# Altium PCB IMU Product.PcbDoc (part 1 of 2)
Units mil, origin at the board's own origin, x right, y up, seen from the top; angles counter-clockwise.
Board outline 944.97 x 945.36 mil, 4 copper layers (Top Layer, Layer 1, Layer 2, Bottom Layer), stack 62.63 mil thick; 58 components, 40 nets, 205 pads, 53 vias.
Unrouted connection lines stored in the file: 29.
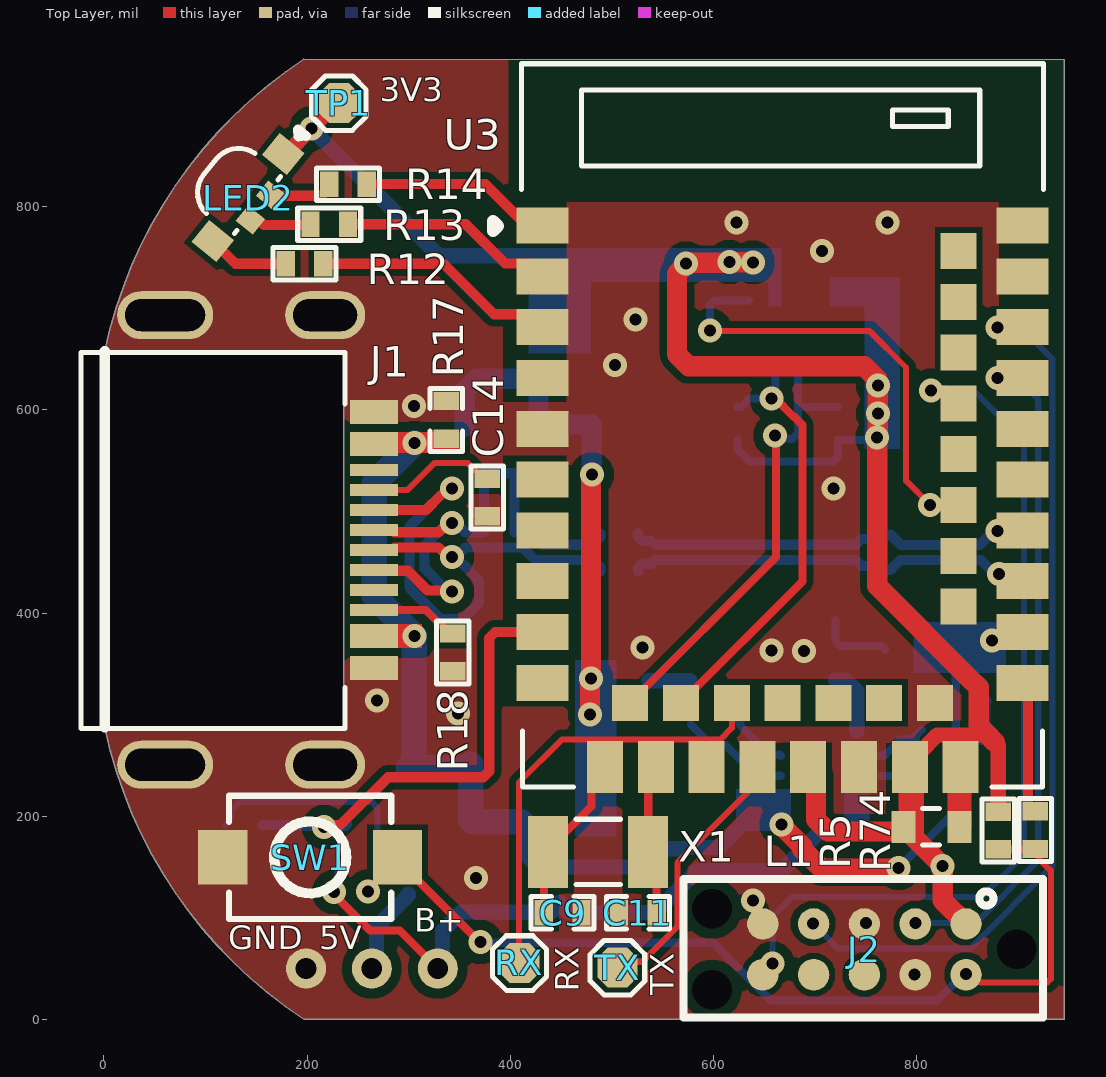
[diagram p0: Top Layer view]
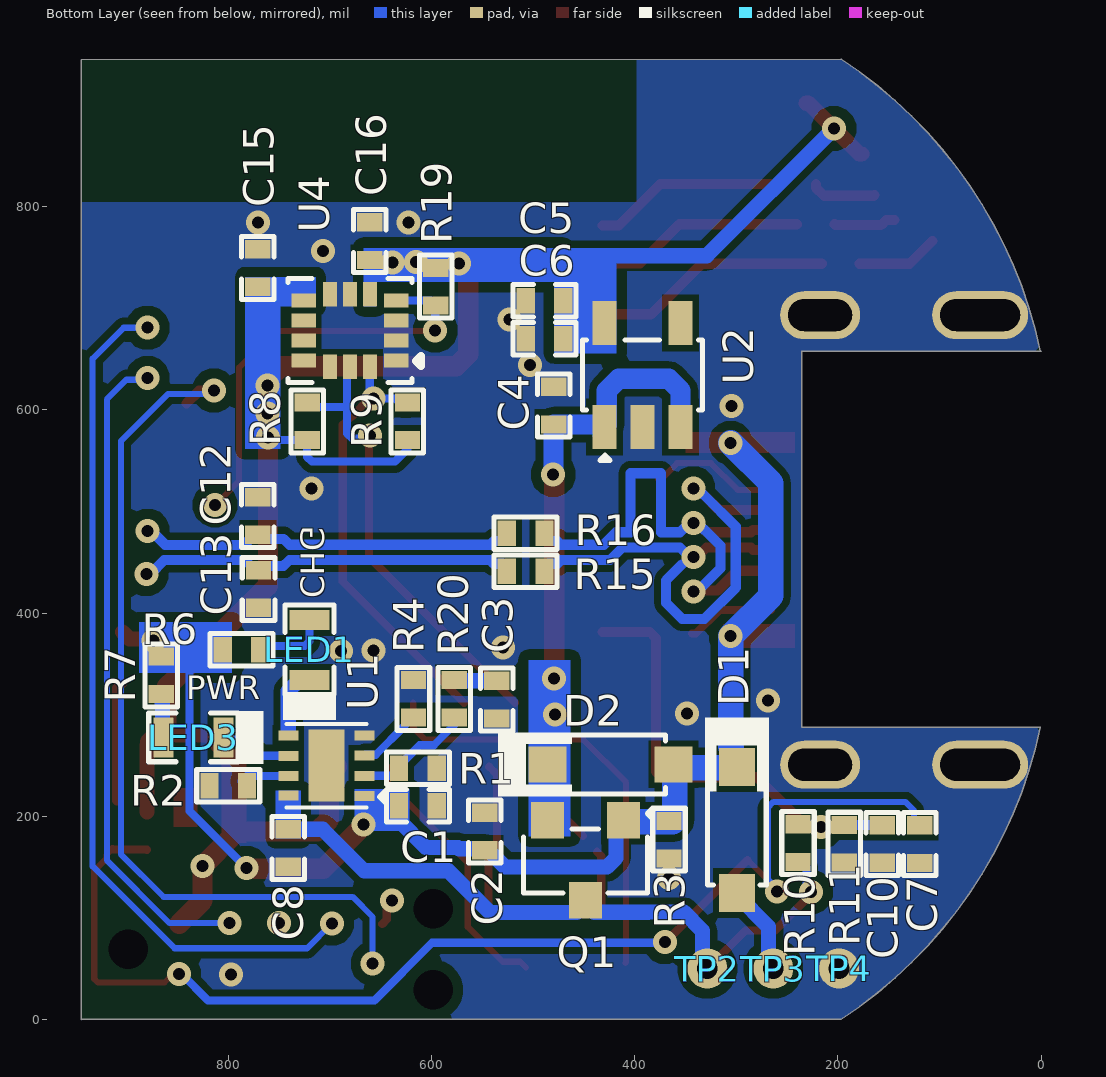
[diagram p1: Bottom Layer view, seen from below]
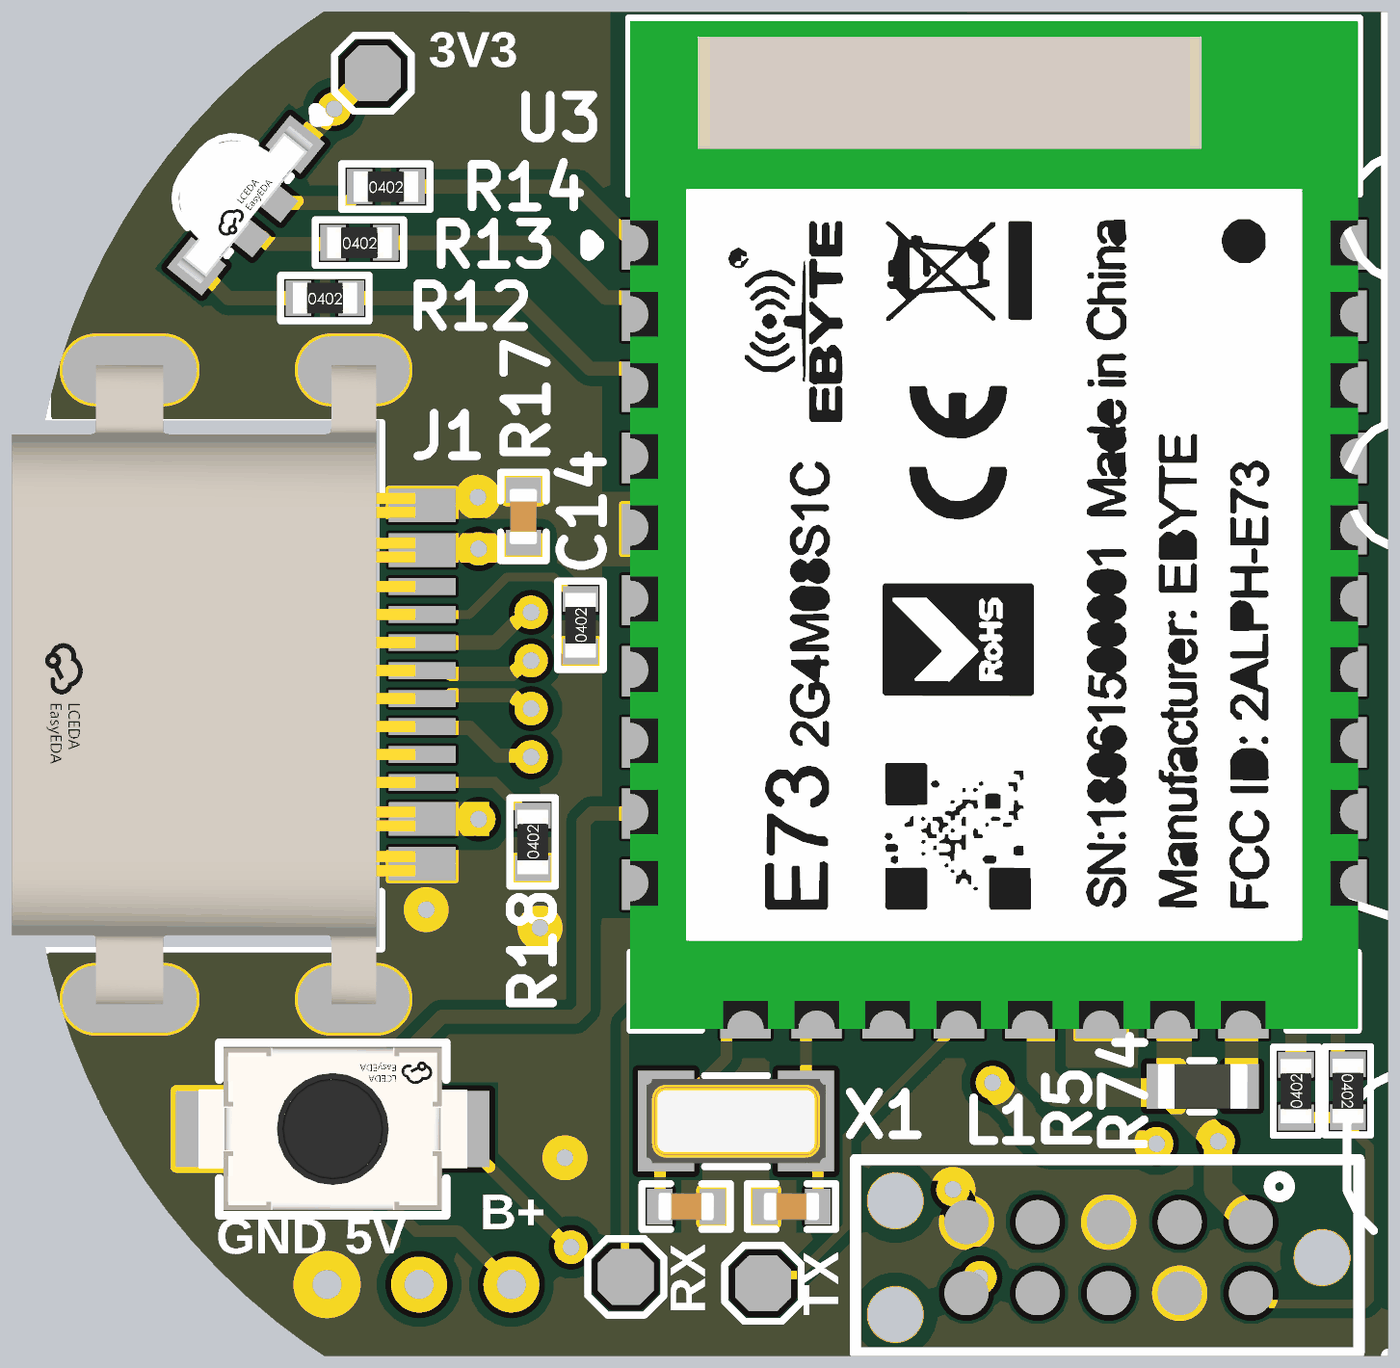
[diagram p2: 3D render of the assembled board from above, using the file's embedded part models]
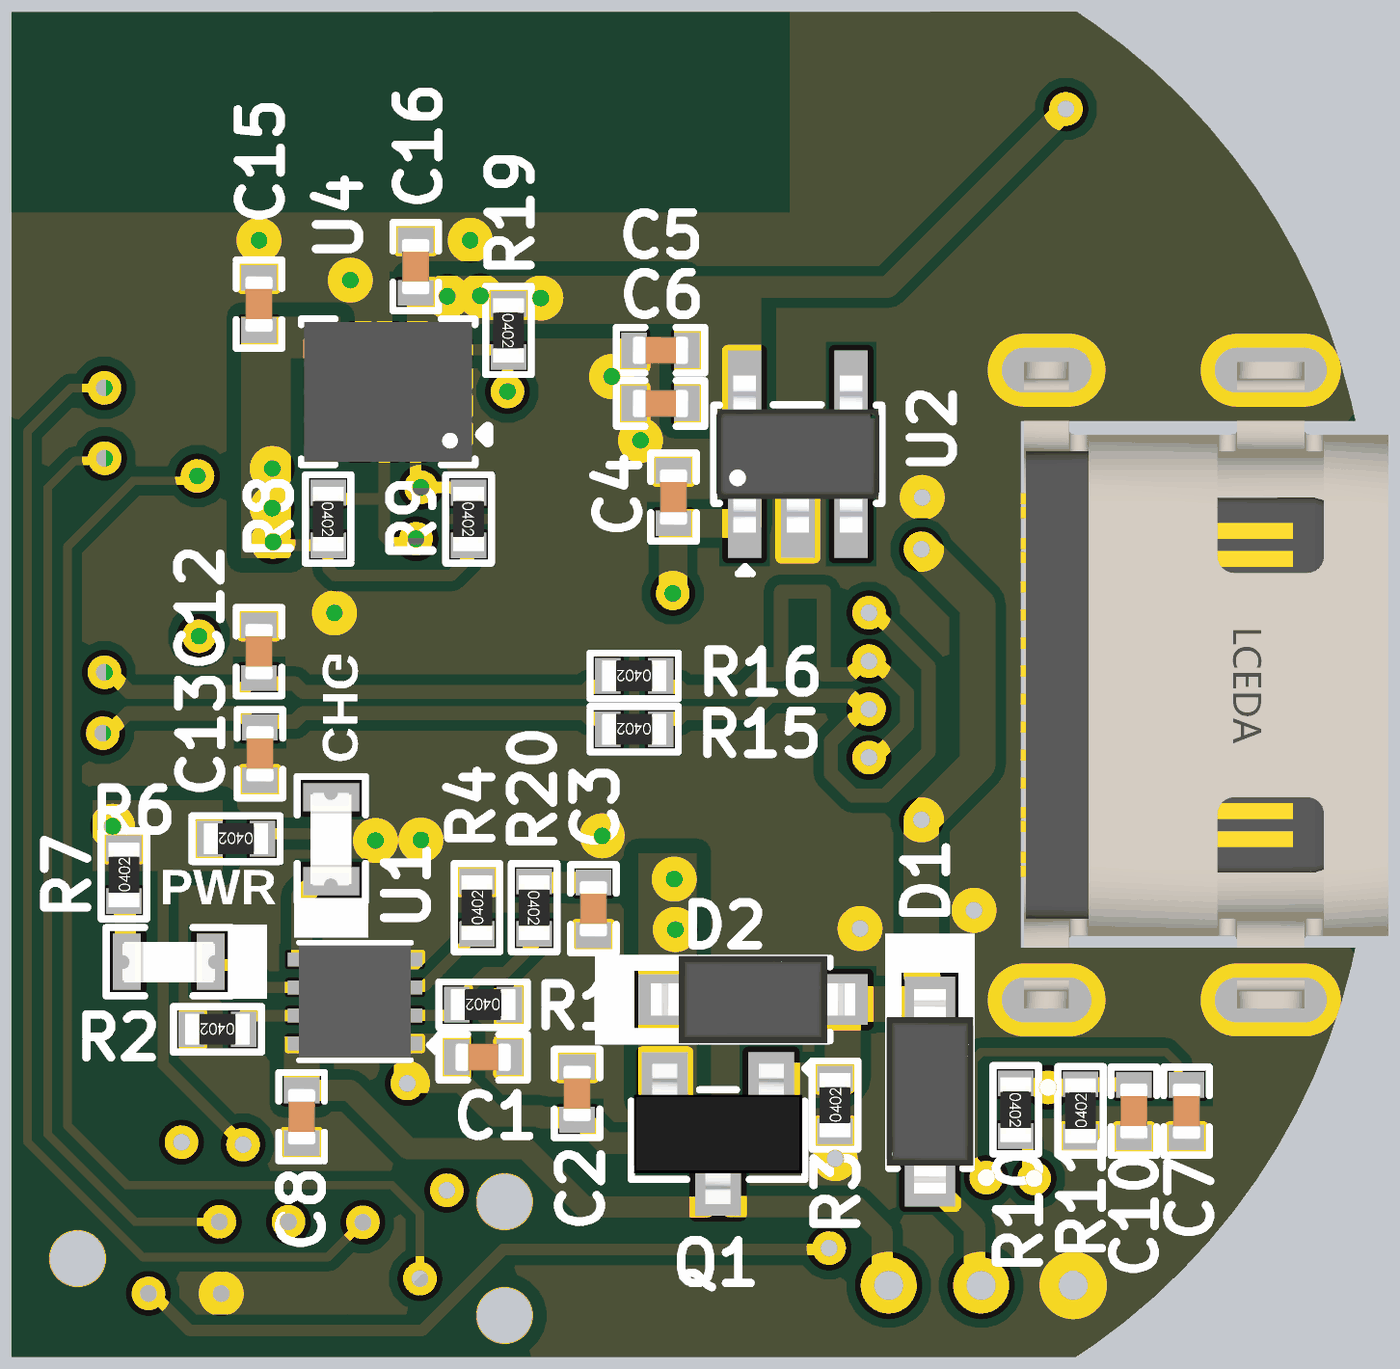
[diagram p3: 3D render of the assembled board from below, using the file's embedded part models]

## Layer stack, top to bottom
Top Solder: solder mask 0.4, Solder Resist, Dk 3.5
Top Layer: signal copper 1.378
Dielectric 2: prepreg 8.2835, PP-006, Dk 4.1
Layer 1: signal copper 0.689
Dielectric 1: dielectric 41.9291, FR-4, Dk 4.8
Layer 2: signal copper 0.689
Dielectric 3: prepreg 8.2835, PP-006, Dk 4.1
Bottom Layer: signal copper 1.378
Bottom Solder: solder mask 0.4, Solder Resist, Dk 3.5

## Board outline
196.88,0 cw(c447.93,381.87) 0.76,287.58 235.84,287.58 235.84,657.66 0.03,657.66 0.76,657.66 cw(c447.93,563.37) 196.88,945.24 196.99,945.12 945,944.76 945,-0.12 944.88,0

## Design rules (kind name [scope] priority, off if disabled: settings)
Clearance Clearance_1 [InAnyDifferentialPair] p1: gap=10 ignorepadtopadclearanceinfootprint=TRUE except(0: Arc-Hole Track-Hole SMDPad-Hole THPad-Hole Via-Hole Fill-Hole Poly-Hole Region-Hole Text-Hole; 5: Arc-Arc Arc-Track Track-Track; 6: Arc-SMDPad Track-SMDPad SMDPad-Fill SMDPad-Poly SMDPad-Region; 7: Arc-Fill Arc-Poly Arc-Region Track-Fill Track-Poly Track-Region SMDPad-SMDPad)
Clearance [All] p2: gap=10 ignorepadtopadclearanceinfootprint=TRUE except(0: Arc-Hole Track-Hole SMDPad-Hole THPad-Hole Via-Hole Fill-Hole Poly-Hole Region-Hole Text-Hole; 6: Arc-SMDPad Track-SMDPad SMDPad-Fill SMDPad-Poly SMDPad-Region; 7: Arc-Fill Arc-Poly Arc-Region Track-Fill Track-Poly Track-Region SMDPad-SMDPad; 8: Arc-Arc Arc-Track Track-Track)
DiffPairsRouting [InDifferentialPairClass('USB_PROGRAM_LINES')] p1: maxlimit=10 minlimit=5 mostfreqgap=10 toplayer_maxgap=5 toplayer_prefgap=5 toplayer_minwidth=10 toplayer_maxwidth=10 toplayer_prefwidth=10 bottomlayer_maxgap=5 bottomlayer_prefgap=5 bottomlayer_minwidth=10 bottomlayer_maxwidth=10 bottomlayer_prefwidth=10 impedanceprofiledriven=TRUE impedanceprofileid={3F5155BB-213D-4E04-9A9F-6D7F9DC84C6C} impedanceprofilevalue=90.000000 maxuncoupledlength=500
MatchedLengths "Schematic Matched Net Lengths_1" [InNetClass('USB_PROGRAM')] p1: tolerance=50 checknetsindiffpair=TRUE checkdiffpairvsdiffpair=FALSE checkxsignals=FALSE checkothers=FALSE
MaxMinImpedance "Schematic Impedance Constraint_1" [InNetClass('USB_PROGRAM')] p1: minimum=85.00 maximum=90.00
PolygonConnect [All] p1: connectstyle=Direct reliefconductorwidth=10 reliefentries=4 polygonreliefangle="90 Angle" airgapwidth=10
RoutingVias [All] p1: holewidth=28 width=50 viastyle="Through Hole" minholewidth=11.81 minwidth=23.62 maxholewidth=28 maxwidth=50
SilkToSilkClearance [All] p1: silktosilkclearance=1
SilkToSolderMaskClearance [IsPad] p1: minsilkscreentomaskgap=1 clearancetoexposedcopper=TRUE
SolderMaskExpansion [All] p1: expansion=4 istentingtop=FALSE
Width [All] p1: maxlimit=50 minlimit=6 preferedwidth=10 midlayer1_minwidth=10 midlayer1_maxwidth=10 midlayer2_minwidth=10 midlayer2_maxwidth=10 minimp=50.000000 maximp=50.000000 favimp=50.000000
27 further rules are at their usual default settings.

## Classes and differential pairs
differential pair class USB_PROGRAM_LINES: D USB_D
net class USB_PROGRAM: D_N D_P USB_D_N USB_D_P
component class U_Power_Sheet: C4 C5 C6 D1 D2 LED1 R3 TP1 TP2 TP3 TP4 U2
component class U_IMU_Sheet: C15 C16 R19 U4
component class U_Controller_Sheet: 34 C9 C10 C11 J2 L1 LED2 R8 R9 R10 R11 R12 R13 R14 RX SW1 TX U3 X1
component class U_Connector_Sheet: C12 C14 J1 R15 R16 R17 R18
differential pair D: +D_P -D_N
differential pair USB_D: +USB_D_P -USB_D_N

## Components (designator, comment, footprint, x,y, rotation, side; value= is the part's Value field where it differs from the comment)
C1 "1uF" Cap-0402 613.52,210.47 r180 bottom
C2 "10uF" Cap-0402 547.55,185.04 r90 bottom
C3 "4.7nF" Cap-0402 536.05,314.78 r90 bottom
C4 "1uF" Cap-0402 479.77,604.12 r270 bottom
C5 "1uF" Cap-0402 488.9,707.25 r180 bottom
C6 "10uF" Cap-0402 488.9,669.85 r180 bottom
C7 "1uF" Cap-0402 119.34,172.55 r90 bottom
C8 "1uF" Cap-0402 741.05,168.71 r270 bottom
C9 "15pF" Cap-0402 451.46,104.95 r180 top
C10 "100nF" Cap-0402 156.35,172.6 r90 bottom
C11 "15pF" Cap-0402 525.48,104.95 r0 top
C12 "22PF" Cap-0402 771,495.5 r270 bottom value=22pF
C13 "22PF" Cap-0402 770.32,423.74 r90 bottom value=22pF
C14 "10uF" Cap-0402 337,590.17 r270 top
C15 "100nF" Cap-0402 771,739.7 r90 bottom
C16 "100nF" Cap-0402 660.91,766.03 r90 bottom
D1 "1N5819HW-7-F" SOD-123 299.57,186.39 r90 bottom
D2 "1N5819HW-7-F" SOD-123 423.86,251.03 r0 bottom
J1 "TYPE-C-31-M-13" TYPE-C-31-M-13 163,472 r270 top locked
J2 "TC2050-IDC-NL" TC2050-IDC-NL_ 748.5,69 r180 top locked
L1 "10uH" "IND-0603 (1608 Metric)" 814.56,189.5 r180 top
LED1 "150060RS75000" LED-0603 720.2,363.71 r270 bottom
LED2 "MHS110FRGBCT" MHS110FRGBCT 148,804 r51 top locked
LED3 "150060BS75000" LED-0603 834.4,277.64 r180 bottom
Q1 "SI2301CDS-T1-BE3" SOT-23 448.54,156.63 r0 bottom
R1 "12K" Res-0402 613.52,247.4 r0 bottom value=12kR
R2 "27K" Res-0402 800.16,230.06 r0 bottom value=27kR
R3 "100K" Res-0402 366.31,176.89 r90 bottom
R4 "10K" Res-0402 617.84,315.58 r90 bottom value=10kR
R5 "10K" Res-0402 880.22,186.02 r90 top value=10kR
R6 "1.5K" Res-0402 787.16,364.04 r0 bottom
R7 "1K" Res-0402 865.9,338.71 r90 bottom
R8 "10K" Res-0402 722.45,588.71 r270 bottom value=10kR
R9 "10K" Res-0402 623.75,588.71 r270 bottom value=10kR
R10 "56K" Res-0402 239.33,173.56 r270 bottom
R11 "200K" Res-0402 193.77,172.89 r90 bottom
R12 "249R" Res-0402 197.43,743.75 r0 top
R13 "47R" Res-0402 221.75,782.74 r0 top
R14 "47R" Res-0402 240.28,822.11 r0 top
R15 "0R" Res-0402 507.4,441 r0 bottom
R16 "0R" Res-0402 507.4,478.43 r0 bottom
R17 "5.1K" Res-0402 377.16,513.62 r90 top
R18 "5.1K" Res-0402 343.51,361.33 r90 top
R19 "10K" Res-0402 595.76,721.2 r270 bottom value=10kR
R20 "2K" Res-0402 577.66,315.58 r270 bottom value=2kR
R74 "0R" Res-0402 916.64,186.33 r270 top
RX "TEST POINT 0.5mm Dia" "Test-point - 0.5mm" 409,55.55 r270 top
SW1 "TS-1088-AR02016" TS-1088-AR02016 203,159.5 r0 top locked
TP1 "TEST POINT 0.5mm Dia" "Test-point - 0.5mm" 231.25,901.84 r180 top
TP2 "0.5mm Test Pad" "0.5mm Test Pad" 328.58,50.12 r90 bottom
TP3 "0.5mm Test Pad" "0.5mm Test Pad" 263.65,50.12 r90 bottom
TP4 "0.5mm Test Pad" "0.5mm Test Pad" 198.95,50.12 r90 bottom
TX "TEST POINT 0.5mm Dia" "Test-point - 0.5mm" 505.48,51 r180 top
U1 "BQ25170JDSGR" WSON-8(2x2) 703.62,249.71 r0 bottom
U2 "XC6210B332MR" Sot-23-5 392.41,634.27 r90 bottom
U3 "E73-2G4M08S1C" E73-2G4M08S1C 668,515 r0 top locked
U4 "LSM6DSV16XTR" "14-LGA (2.5x3)" 680.28,678.06 r0 bottom
X1 "Q13FC13500004" SMD3215-2P 486.5,165 r0 top

## Footprints (in the part's own frame and the unit in brackets; to place one, negate y for a bottom-side part, rotate by r counter-clockwise, add the part's x,y. Pads: shape width x height; smd on the part's side, far side on the other; paste and mask are expansions set on the pad)
"0.5mm Test Pad" [mm]
  round 1 hole 0.52: 1(0,0)
"14-LGA (2.5x3)" [mm]
  rect 0.61x0.35 smd mask+0.05: 1(-1.16,0.75) 2(-1.16,0.25) 3(-1.16,-0.25) 4(-1.16,-0.75) 8(1.16,-0.75) 9(1.16,-0.25) 10(1.16,0.25) 11(1.16,0.75)
  rect 0.35x0.61 smd mask+0.05: 5(-0.5,-0.91) 6(0,-0.91) 7(0.5,-0.91) 12(0.5,0.91) 13(0,0.91) 14(-0.5,0.91)
  silkscreen extent -1.78,-1.3 1.55,1.3, body extent -1.5,-1.25 1.5,1.25, height 0.86
Cap-0402 [mil]
  rect 18x25 smd mask+2.36: 1(-18.5,0) 2(18.5,0)
  silkscreen extent -31,-16 31,16, body extent -20,-10 20,10, height 19
E73-2G4M08S1C [mm]
  rect 1.3x0.9 smd paste+0 mask+0.05: 1(-6,6.765) 2(-6,5.495) 3(-6,4.225) 4(-6,2.955) 5(-6,1.685) 6(-6,0.415) 7(-6,-0.855) 8(-6,-2.125) 9(-6,-3.395) 10(-6,-4.665) 26(6,-4.665) 27(6,-3.395) 29(6,-2.125) 31(6,-0.855) 33(6,0.415) 35(6,1.685) 37(6,2.955) 39(6,4.225) 41(6,5.495) 43(6,6.765)
  rect 0.9x1.3 smd paste+0 mask+0.05: 11(-4.44,-6.765) 13(-3.17,-6.765) 15(-1.9,-6.765) 17(-0.63,-6.765) 19(0.64,-6.765) 21(1.91,-6.765) 23(3.18,-6.765) 25(4.45,-6.765)
  rect 0.9x0.9 smd paste+0 mask+0.05: 12(-3.81,-5.165) 14(-2.54,-5.165) 16(-1.27,-5.165) 18(0,-5.165) 20(1.27,-5.165) 22(2.54,-5.165) 24(3.81,-5.165) 28(4.4,-2.76) 30(4.4,-1.49) 32(4.4,-0.22) 34(4.4,1.05) 36(4.4,2.32) 38(4.4,3.59) 40(4.4,4.86) 42(4.4,6.13)
  silkscreen extent -7.24,-7.26 6.53,10.81, body extent -6.5,-7.24 6.5,10.76, height 2.9
"IND-0603 (1608 Metric)" [mm] "0.063\" L x 0.032\" W (1.60mm x 0.80mm)"
  rect 0.6x0.8 smd: 1(-0.7,0) 2(0.7,0)
  silkscreen extent -0.2,-0.46 0.23,0.46, body extent -0.8,-0.4 0.8,0.4, height 0.78
LED-0603 [mm]
  rect 0.5x1 smd: 1(-0.75,0) 2(0.75,0)
  silkscreen extent -1.12,-0.66 1.75,0.66, body extent -0.82,-0.37 0.82,0.36, height 0.68
MHS110FRGBCT [mm]
  rect 0.7x0.8 smd: 1(1.4,0.2) 4(-1.4,0.2)
  rect 0.5x0.55 smd: 2(0.4,-0.2) 3(-0.4,-0.2)
  silkscreen extent -0.97,-0.1 2.11,1.43, body extent -1.6,-0.05 1.6,1.45, height 1.01
Res-0402 [mil]
  rect 18x25 smd mask+2.17: 1(-18.5,0) 2(18.5,0)
  silkscreen extent -32,-17 32,16, body extent -23,-11 23,11, height 16
SMD3215-2P [mm]
  rect 1x1.8 smd: 1(-1.25,0) 2(1.25,0)
  silkscreen extent -0.56,-0.81 0.56,0.81, body extent -1.6,-0.75 1.6,0.75, height 0.8
SOD-123 [mm]
  rect 0.95x0.9 smd: 1(-1.575,0) 2(1.575,0)
  silkscreen extent -1.37,-0.8 2.82,0.8, body extent -1.82,-0.77 1.83,0.78, height 1.5
SOT-23 [mm] "TRANS NPN 40V 0.6A SOT23"
  rect 0.82x0.92 smd: 1(-0.95,-1) 2(0.95,-1) 3(0,1)
  silkscreen extent -1.68,-1.3 1.55,0.81, body extent -1.5,-1.25 1.5,1.25, height 1.05
Sot-23-5 [mm]
  rect 1.1x0.6 smd: 1(-1.3,0.95) 2(-1.3,0) 3(-1.3,-0.95) 4(1.3,-0.95) 5(1.3,0.95)
  silkscreen extent -2.13,-1.5 0.88,1.5, body extent -1.4,-1.45 1.4,1.45, height 1.45
TC2050-IDC-NL_ [mm] "CBL PLUG-OF-NAILS 10-PIN"
  round 0.787 smd: 1(-2.54,-0.635) 2(-1.27,-0.635) 3(0,-0.635) 4(1.27,-0.635) 5(2.54,-0.635) 6(2.54,0.635) 7(1.27,0.635) 8(0,0.635) 9(-1.27,0.635) 10(-2.54,0.635)
  round 0 hole 0.991: MP1(-3.81,0) MP2(3.81,1.015) MP3(3.81,-1.015)
  silkscreen extent -4.47,-1.75 4.52,1.7
"Test-point - 0.5mm" [mm]
  oct 1x1 smd: 1(0,0)
  silkscreen extent -0.68,-0.68 0.68,0.68
TS-1088-AR02016 [mm]
  rect 1.23x1.36 smd: 1(-2.185,0) 2(2.185,0)
  silkscreen extent -2.03,-1.54 2.03,1.54, body extent -2.4,-1.45 2.4,1.45, height 1.95
TYPE-C-31-M-13 [mm]
  rect 0.3x1.2 smd paste-100 mask+0.051: A1(-3.35,2.612) A4(-2.55,2.612) A5(-1.25,2.612) A6(-0.25,2.612) A7(0.25,2.612) A8(1.25,2.612) A9(2.55,2.612) A12(3.35,2.612) B1(3.05,2.612) B4(2.25,2.612) B5(1.75,2.612) B6(0.75,2.612) B7(-0.75,2.612) B8(-1.75,2.612) B9(-2.25,2.612) B12(-3.05,2.612)
  oval 1.2x2 hole 0.8 slot 1.6 at 90 deg paste+0 mask+0.051: S1(-5.62,1.388) S4(5.62,1.388)
  oval 1.2x2.4 hole 0.8 slot 2 at 90 deg paste+0 mask+0.051: S2(-5.62,-2.612) S3(5.62,-2.612)
  silkscreen extent -4.68,-4.71 4.72,1.89, body extent -5.77,-4.71 5.77,2.49, height 1.76
WSON-8(2x2) [mm]
  rect 0.5x0.25 smd paste+0 mask+0.051: 1(-0.949,0.751) 2(-0.951,0.252) 3(-0.95,-0.251) 4(-0.951,-0.751) 5(0.951,-0.751) 6(0.951,-0.249) 7(0.951,0.251) 8(0.951,0.75)
  rect 0.9x1.8 smd paste+0 mask+0.051: 9(0,0)
  silkscreen extent -1.46,-1.05 1,1.05, body extent -1,-1 1,1, height 0.77

## Part data
C1 C4 C5 C7 C8: library part GRM155C71C105KE11D, "CAP CER 1UF 16V X7S 0402", Case/Package=343Case, Dielectric=1542DielectricType, LCSC Part Number=C576449, Manufacturer=Murata, Max Operating Temperature=125°C, Min Operating Temperature=-55°C, Tolerance=10%, Voltage Rating=16V, Height=600um, Item Type=Capacitors, Length=1mm, Manufacturer Part Number=GRM155C71C105KE11D, Material=4241ConductorMaterial, Pricing="1=0.11, 10=0.041, 50=0.041, 100=0.026, 1000=0.023, 10000=0.016 (USD)", RoHS=No, Stock=16102, Supplier=Mouser, Thickness=500um, Voltage Rating (DC)=16V, Width=500um
C2 C6 C14: library part CL05A106MP5NUNC, "CAP CER 10UF 10V X5R 0402", Case Code (Imperial)=0402, Case Code (Metric)=1005, Dielectric=X5R, LCSC Part Number=C315248, Manufacturer=Samsung, Max Operating Temperature=85°C, Min Operating Temperature=-55°C, Package Quantity=1, Tolerance=20%, Voltage Rating=10V, Capacitance=10uF, Case/Package=0402, Category="Ceramic Capacitors", ComponentLink1Description=https://datasheet.ciiva.com/25721/cl05a106mp5nunc-25721584.pdf?src-supplier=Digi-Key, ComponentLink1URL=https://datasheet.ciiva.com/25721/cl05a106mp5nunc-25721584.pdf?src-supplier=Digi-Key, ComponentLink2Description=https://datasheet.ciiva.com/26838/getdatasheetpartid-745310-26838170.pdf?src-supplier=Verical, ComponentLink2URL=https://datasheet.ciiva.com/26838/getdatasheetpartid-745310-26838170.pdf?src-supplier=Verical, Construction=Flat, Contact Plating=Tin, Depth=0.5mm, Item Type=Capacitor, Lead Free="Lead Free", Length=1mm, Manufacturer Part Number=CL05A106MP5NUNC, Mount="Surface Mount", Packaging="Tape and Reel", Pricing 1="10000=0.02537 (USD)", Radiation Hardening=No, RoHS=Yes, RoHS Compliant=Yes, Series=CL, Stock 1=1729850, Supplier 1=Avnet, Supplier Part Number 1=CL05A106MP5NUNC, Termination=Wraparound, Thickness=0.028inch, Width=0.02inch
C3: library part CC0402KRX7R9BB472, "CAP CER 4700PF 50V X7R 0402", Case Code (Imperial)=0402, Case Code (Metric)=1005, Dielectric=X7R, LCSC Part Number=C106208, Manufacturer=Yageo, Max Operating Temperature=125°C, Min Operating Temperature=-55°C, Package Quantity=1, Supplier Part Number 1=1989300, Temperature Coefficient=30ppm/°C, Tolerance=10%, Voltage Rating=50V, Capacitance=4.7nF, Case/Package=0402, ComponentLink1Description=https://datasheet.ciiva.com/7978/1489800-7978108.pdf?src-supplier=Element14, ComponentLink1URL=https://datasheet.ciiva.com/7978/1489800-7978108.pdf?src-supplier=Element14, ComponentLink2Description=https://datasheet.ciiva.com/176/mlccorderingcode-176364.pdf?src-supplier=Digikey, ComponentLink2URL=https://datasheet.ciiva.com/176/mlccorderingcode-176364.pdf?src-supplier=Digikey, ComponentLink3Description=https://datasheet.ciiva.com/176/mlccorderingcode-176363.pdf?src-supplier=Digikey, ComponentLink3URL=https://datasheet.ciiva.com/176/mlccorderingcode-176363.pdf?src-supplier=Digikey, ComponentLink4Description=https://datasheet.ciiva.com/176/mlccorderingcode-176365.pdf?src-supplier=Digikey, ComponentLink4URL=https://datasheet.ciiva.com/176/mlccorderingcode-176365.pdf?src-supplier=Digikey, ComponentLink5Description=https://datasheet.ciiva.com/11586/upy-gphc-x7r-6-3v-to-50v-8-11586491.pdf?src-supplier=Avnet, ComponentLink5URL=https://datasheet.ciiva.com/11586/upy-gphc-x7r-6-3v-to-50v-8-11586491.pdf?src-supplier=Avnet, Construction=Flat, Depth=0.5mm, Halogen Free=5694HalogenFree, Height=0.5mm, Item Type=Capacitor, Lead Free=5697LeadFree, Length=1mm, Manufacturer Part Number=CC0402KRX7R9BB472, Material=4241ConductorMaterial, Mount="Surface Mount", Number of Pins=2NUMBER, Packaging="Tape and Reel", Pricing 1="10000=0.0021, 40000=0.002, 150000=0.0019, 400000=0.0018, 1000000=0.0017 (USD)", Radiation Hardening=No, Reach SVHC Compliant=No, RoHS=Yes, RoHS Compliant=Yes, Series=CC, Stock 1=1780000, Supplier 1="Future Electronics", Termination=SMD/SMT, Thickness=0.022inch, Voltage Rating (DC)=50V, Width=0.02inch
C9 C11: library part CQ0402GRNPO9BN150, "CAP CER 15PF 50V C0G/NPO 0402", Case Code (Imperial)=0402, Case Code (Metric)=1005, Dielectric=C0G, LCSC Part Number=C577406, Manufacturer=Yageo, Max Operating Temperature=125°C, Min Operating Temperature=-55°C, Package Quantity=10000, Tolerance=2%, Voltage Rating=50V, Case/Package=0402, ComponentLink1Description=http://www.mouser.com/ds/2/447/UPY-High%20Q_NP0_16V-to-250V_11-533944.pdf?src-supplier=Mouser, ComponentLink1URL=http://www.mouser.com/ds/2/447/UPY-High%20Q_NP0_16V-to-250V_11-533944.pdf?src-supplier=Mouser, ComponentLink2Description=http://www.yageo.com/documents/recent/UPY-High%20Q_NP0_16V-to-250V_13.pdf?src-supplier=Digikey, ComponentLink2URL=http://www.yageo.com/documents/recent/UPY-High%20Q_NP0_16V-to-250V_13.pdf?src-supplier=Digikey, Item Type=Capacitors, Manufacturer Part Number=CQ0402GRNPO9BN150, Mounting Technology="Surface Mount", Packaging="Tape and Reel", Pricing="10000=0.04366 (USD)", RoHS=Yes, Series=CQ, Supplier=Digikey, Voltage Rating (DC)=50V, Weight=2.3E-05oz
C10 C15 C16: library part CC0402KRX5R8BB104, "CAP CER 0.1UF 25V X5R 0402", Case Code (Imperial)=0402, Case Code (Metric)=1005, Dielectric=X5R, LCSC Part Number=C106256, Manufacturer=Yageo, Max Operating Temperature=85°C, Min Operating Temperature=-55°C, Resistor Type=Ceramic, Supplier Part Number 1=311-1697-1-ND, Tolerance=10%, Voltage Rating=25V, Capacitance=100nF, Case/Package=0402, Category="Ceramic Capacitors", ComponentLink1Description=http://www.mouser.com/ds/2/447/UPY-GPHC_X5R_4V-to-50V_25-1131599.pdf?src-supplier=Mouser, ComponentLink1URL=http://www.mouser.com/ds/2/447/UPY-GPHC_X5R_4V-to-50V_25-1131599.pdf?src-supplier=Mouser, ComponentLink2Description=http://www.yageo.com/documents/recent/UPY-GPHC_X5R_4V-to-50V-16.pdf?src-supplier=Future+Electronics, ComponentLink2URL=http://www.yageo.com/documents/recent/UPY-GPHC_X5R_4V-to-50V-16.pdf?src-supplier=Future+Electronics, ComponentLink3Description=http://www.yageo.com/documents/recent/UPY-GPHC_X5R_4V-to-50V_25.pdf?src-supplier=Digi-Key, ComponentLink3URL=http://www.yageo.com/documents/recent/UPY-GPHC_X5R_4V-to-50V_25.pdf?src-supplier=Digi-Key, Depth=0.5mm, Halogen Free="Halogen Free", Item Type=Capacitor, Lead Free="Lead Free", Length=0.039inch, Manufacturer Part Number=CC0402KRX5R8BB104, Mount="Surface Mount", Packaging="Tape and Reel", Pricing 1="1=0.10000, 10=0.03800, 50=0.02100, 100=0.01710, 500=0.01224, 1000=0.00961, 2500=0.00874, 5000=0.00804 (USD)", RoHS=Yes, RoHS Compliant=Yes, Series=CC, Stock 1=4598218, Supplier 1=Digi-Key, Thickness=0.022inch, Voltage Rating (DC)=25V, Width=0.02inch
C12 C13: library part CC0402JRNPO9BN220, "CAP CER 22PF 50V C0G/NPO 0402", Case Code (Imperial)=0402, Case Code (Metric)=1005, Dielectric=C0G, Dielectric Material=Ceramic, Insulation Resistance=100GR, LCSC Part Number=C106203, Manufacturer=Yageo, Max Operating Temperature=125°C, Min Operating Temperature=-55°C, Package Quantity=1, Supplier Part Number 1=9105957, Temperature Coefficient=30ppm/°C, Tolerance=5%, Voltage=50V, Case/Package=0402, Category="Ceramic Capacitors", ComponentLink1Description=https://datasheet.ciiva.com/5789/1443161-5789509.pdf?src-supplier=Farnell, ComponentLink1URL=https://datasheet.ciiva.com/5789/1443161-5789509.pdf?src-supplier=Farnell, ComponentLink2Description=https://datasheet.ciiva.com/8033/1443161-8033606.pdf?src-supplier=Element14, ComponentLink2URL=https://datasheet.ciiva.com/8033/1443161-8033606.pdf?src-supplier=Element14, ComponentLink3Description=https://datasheet.ciiva.com/7656/1132289-7656615.pdf?src-supplier=Element14, ComponentLink3URL=https://datasheet.ciiva.com/7656/1132289-7656615.pdf?src-supplier=Element14, ComponentLink4Description=https://datasheet.ciiva.com/8033/1443161-8033607.pdf?src-supplier=Element14, ComponentLink4URL=https://datasheet.ciiva.com/8033/1443161-8033607.pdf?src-supplier=Element14, ComponentLink5Description=https://datasheet.ciiva.com/8033/1443161-8033605.pdf?src-supplier=Element14, ComponentLink5URL=https://datasheet.ciiva.com/8033/1443161-8033605.pdf?src-supplier=Element14, ComponentLink6Description=https://datasheet.ciiva.com/143/mlccorderingcode-143987.pdf?src-supplier=Digi-Key, ComponentLink6URL=https://datasheet.ciiva.com/143/mlccorderingcode-143987.pdf?src-supplier=Digi-Key, ComponentLink7Description=https://datasheet.ciiva.com/143/mlccorderingcode-143986.pdf?src-supplier=Digi-Key, ComponentLink7URL=https://datasheet.ciiva.com/143/mlccorderingcode-143986.pdf?src-supplier=Digi-Key, ComponentLink8Description=https://datasheet.ciiva.com/143/mlccorderingcode-143988.pdf?src-supplier=Digi-Key, ComponentLink8URL=https://datasheet.ciiva.com/143/mlccorderingcode-143988.pdf?src-supplier=Digi-Key, ComponentLink9Description=https://datasheet.ciiva.com/5425/upy-gp-np0-16v-to-50v-8-5425483.pdf?src-supplier=Mouser, ComponentLink9URL=https://datasheet.ciiva.com/5425/upy-gp-np0-16v-to-50v-8-5425483.pdf?src-supplier=Mouser, ComponentLink10Description=https://datasheet.ciiva.com/15189/getdatasheetpartid-370074-15189117.pdf?src-supplier=Verical, ComponentLink10URL=https://datasheet.ciiva.com/15189/getdatasheetpartid-370074-15189117.pdf?src-supplier=Verical, Depth=0.5mm, Height=0.5mm, Item Type=Capacitor, Lead Free="Lead Free", Length=1mm, Manufacturer Part Number=CC0402JRNPO9BN220, Mounting Technology="Surface Mount", Packaging="Tape and Reel", Pins=2, Pricing 1="10000=0.00220, 40000=0.00210, 150000=0.00200, 400000=0.00190, 1000000=0.00180 (USD)", Radiation Hardening=No, Reach SVHC Compliant=Yes, Resistor Type=Ceramic, RoHS=Yes, RoHS Compliant=Yes, Series=CC, Stock 1=200000, Supplier 1="Future Electronics", Termination=SMD/SMT, Thickness=0.022inch, Voltage Rating=50V, Voltage Rating (DC)=50V, Width=0.02inch
D1 D2: "DIODE SCHOTTKY 40V 1A SOD123", Average Rectified Current=1A, Capacitance=110pF, Case/Package=SOD-123-2, Forward Voltage=450mV, LCSC Part Number=C82544, Manufacturer=Diodes, Max Forward Surge Current (Ifsm)=25A, Max Operating Temperature=125°C, Max Power Dissipation=450mW, Max Repetitive Reverse Voltage (Vrrm)=40V, Max Reverse Current=50uA, Min Operating Temperature=-65°C, Package Quantity=3000, Supplier Part Number 1=1N5819HW-FDICT-ND, Category="Schottky Diodes", ComponentLink1Description=https://datasheet.ciiva.com/16303/ds30217-16303296.pdf?src-supplier=Future+Electronics, ComponentLink1URL=https://datasheet.ciiva.com/16303/ds30217-16303296.pdf?src-supplier=Future+Electronics, ComponentLink2Description=https://datasheet.ciiva.com/27092/1538419-27092484.pdf?src-supplier=Jameco, ComponentLink2URL=https://datasheet.ciiva.com/27092/1538419-27092484.pdf?src-supplier=Jameco, ComponentLink3Description=https://datasheet.ciiva.com/912/ds30217-912801.pdf?src-supplier=Digi-Key, ComponentLink3URL=https://datasheet.ciiva.com/912/ds30217-912801.pdf?src-supplier=Digi-Key, ComponentLink4Description=https://datasheet.ciiva.com/1177/ds30217-1177089.pdf?src-supplier=Element14, ComponentLink4URL=https://datasheet.ciiva.com/1177/ds30217-1177089.pdf?src-supplier=Element14, ComponentLink5Description=https://datasheet.ciiva.com/912/ds30217-912802.pdf?src-supplier=Digi-Key, ComponentLink5URL=https://datasheet.ciiva.com/912/ds30217-912802.pdf?src-supplier=Digi-Key, ComponentLink6Description=https://datasheet.ciiva.com/912/ds30217-912803.pdf?src-supplier=Digi-Key, ComponentLink6URL=https://datasheet.ciiva.com/912/ds30217-912803.pdf?src-supplier=Digi-Key, ComponentLink7Description=https://datasheet.ciiva.com/8303/ds30217-8303132.pdf?src-supplier=Avnet, ComponentLink7URL=https://datasheet.ciiva.com/8303/ds30217-8303132.pdf?src-supplier=Avnet, ComponentLink8Description=https://datasheet.ciiva.com/25919/ds30217-25919644.pdf?src-supplier=Avnet+Europe, ComponentLink8URL=https://datasheet.ciiva.com/25919/ds30217-25919644.pdf?src-supplier=Avnet+Europe, Contact Plating=Tin,Matte, Current Rating=1A, Element Configuration=Single, Forward Current=1A, Height=1.25mm, Item Type=Diode, Lead Free="Lead Free", Length=2.85mm, Manufacturer Part Number=1N5819HW-7-F, Max Reverse Voltage (DC)=40V, Number of Pins=2, Output Current=1A, Packaging="Tape and Reel", Peak Non-Repetitive Surge Current=25A, Polarity=Standard, Pricing 1="1=0.46000, 10=0.34500, 100=0.19530, 500=0.12936, 1000=0.09918 (USD)", Radiation Hardening=No, REACH SVHC="No SVHC", RoHS=Yes, RoHS Compliant=Yes, Series=-, Supplier 1=Digi-Key, Termination=SMD/SMT, Voltage Rating (DC)=40V, Weight=0.000353oz, Width=1.7mm
J1: "1 12P Female Type-C SMD USB Connectors ROHS", LCSC Part Number=C223906, Manufacturer="Korean Hroparts Elec", Package=SMD, ComponentLink1Description=LCSC, ComponentLink1URL=https://www.lcsc.com/product-detail/USB-Connectors_Korean-Hroparts-Elec-TYPE-C-31-M-13_C223906.html?s_z=n_TYPE-C-31-M-13, Item Type="USB Type-C  Connector", Manufacturer Part Number=TYPE-C-31-M-13
J2: "CBL PLUG-OF-NAILS 10-PIN", Manufacturer=Tag-Connect, Package Quantity=1, Supplier Part Number 1=TC2050-IDC-NL-ND, ComponentLink1Description=http://www.tag-connect.com/Materials/TC2050-IDC-NL%20Datasheet.pdf?src-supplier=Digi-Key, ComponentLink1URL=http://www.tag-connect.com/Materials/TC2050-IDC-NL%20Datasheet.pdf?src-supplier=Digi-Key, Manufacturer Part Number=TC2050-IDC-NL, Pricing 1="1=40.17 (USD)", Stock 1=544, Supplier 1=Digi-Key
L1: library part LBMF1608T100K, "FIXED IND 10UH 80MA 360 MOHM SMD", Case Code (Imperial)=0603, Case Code (Metric)=1608, DC Current=80mA, DC Resistance (DCR)=360mR, Inductance Tolerance=10%, LCSC Part Number=C87216, Manufacturer="Taiyo Yuden", Max Operating Temperature=105°C, Min Operating Temperature=-40°C, Self Resonant Frequency=32MHz, Test Frequency=2.52MHz, Case/Package=0603, ComponentLink1Description=https://datasheet.ciiva.com/26872/getdatasheetpartid-637440-26872437.pdf?src-supplier=Verical, ComponentLink1URL=https://datasheet.ciiva.com/26872/getdatasheetpartid-637440-26872437.pdf?src-supplier=Verical, ComponentLink2Description=https://datasheet.ciiva.com/15986/610lbmf1608t100k-15986589.pdf?src-supplier=Onlinecomponents.com, ComponentLink2URL=https://datasheet.ciiva.com/15986/610lbmf1608t100k-15986589.pdf?src-supplier=Onlinecomponents.com, ComponentLink3Description=https://datasheet.ciiva.com/1040/lbmf1608t100k-ss-1040360.pdf?src-supplier=Digikey, ComponentLink3URL=https://datasheet.ciiva.com/1040/lbmf1608t100k-ss-1040360.pdf?src-supplier=Digikey, ComponentLink4Description=https://datasheet.ciiva.com/8504/lbmf1608t100k-ss-8504740.pdf?src-supplier=Avnet, ComponentLink4URL=https://datasheet.ciiva.com/8504/lbmf1608t100k-ss-8504740.pdf?src-supplier=Avnet, ComponentLink5Description=https://datasheet.ciiva.com/46395/1497259-46395174.pdf?src-supplier=Element14, ComponentLink5URL=https://datasheet.ciiva.com/46395/1497259-46395174.pdf?src-supplier=Element14, Core Material=Ferrite, Depth=0.9mm, ESR=468mR, Height=0.35mm, Item Type=Inductors, Lead Pitch=0.7mm, Length=1.6mm, Manufacturer Part Number=LBMF1608T100K, Max DC Current=80mA, Military Standard=Not, Mounting Technology="Surface Mount", Packaging="Tape and Reel", Pricing="1=0.13, 10=0.103, 25=0.0936, 50=0.0866, 100=0.0802, 250=0.07256, 500=0.06724, 1000=0.0623 (USD)", Radiation Hardening=No, Reach SVHC Compliant=Unknown, RMS Current (Irms)=80mA, RoHS=Yes, RoHS Compliant=Yes, Series="LB, MF Type", Shielding=Unshielded, Stock=2726337, Supplier=Digikey, Termination=SMD/SMT, Tolerance=10%, Weight=7.1E-05oz, Width=0.8mm
LED1: "LED RED CLEAR 0603 SMD", Case Code (Imperial)=0603, Case Code (Metric)=1608, Color=Red, Forward Current=30mA, Forward Voltage=2V, LCSC Part Number=C3030991, Lens Color=Colorless, Manufacturer="Wurth Electronics", Max Operating Temperature=85°C, Max Reverse Voltage (DC)=5V, Min Operating Temperature=-40°C, Package Quantity=1, Power Dissipation=72mW, Test Current=20mA, Case/Package=0603, ComponentLink1Description=https://datasheet.ciiva.com/29563/150060rs75000-29563040.pdf?src-supplier=Digikey, ComponentLink1URL=https://datasheet.ciiva.com/29563/150060rs75000-29563040.pdf?src-supplier=Digikey, ComponentLink2Description=https://datasheet.ciiva.com/29279/759428-da-01-en-chipled-0603-w-kl-rot-150060rs75000-29279196.pdf?src-supplier=Conrad, ComponentLink2URL=https://datasheet.ciiva.com/29279/759428-da-01-en-chipled-0603-w-kl-rot-150060rs75000-29279196.pdf?src-supplier=Conrad, Dominant Wavelength=625nm, Height=0.8mm, Item Type=LEDs, Length=1.6mm, Lens Size=0.7mm, Lens Style=Clear,Flat,Rectangular, Lens Transparency=Clear, Luminous Intensity=250mcd, Manufacturer Part Number=150060RS75000, Mounting Technology="Surface Mount", Packaging="Cut Tape", Reach SVHC Compliant=Unknown, Reverse Voltage=5V, RoHS=Yes, RoHS Compliant=Yes, Series=WL-SMCW, Stock=15900, Supplier=Rs, Viewing Angle=140°, Wavelength=625nm, Width=0.8mm
LED2: "Colorless transparence Side stickers -40℃~+85℃ Common anode RGB 120° 60mW SMD,1.5x3.2mm Light Emitting Diodes (LED) ROHS", LCSC Part Number=C496820, Manufacturer=MEIHUA, Package=SMD,1.5x3.2mm, ComponentLink1Description=LCSC, ComponentLink1URL=https://www.lcsc.com/product-detail/Light-Emitting-Diodes-LED_MEIHUA-MHS110FRGBCT_C496820.html, Item Type="RGB LED", Manufacturer Part Number=MHS110FRGBCT
LED3: "LED BLUE CLEAR 0603 SMD", Case Code (Imperial)=0603, Case Code (Metric)=1608, Color=Red, Forward Current=30mA, Forward Voltage=2V, LCSC Part Number=C5197644, Lens Color=Colorless, Manufacturer="Wurth Electronics", Manufacturer Part Number=150060RS75000, Max Operating Temperature=85°C, Max Reverse Voltage (DC)=5V, Min Operating Temperature=-40°C, Package Quantity=1, Power Dissipation=72mW, Test Current=20mA, Case/Package=0603, ComponentLink1Description=https://datasheet.ciiva.com/29563/150060rs75000-29563040.pdf?src-supplier=Digikey, ComponentLink1URL=https://datasheet.ciiva.com/29563/150060rs75000-29563040.pdf?src-supplier=Digikey, ComponentLink2Description=https://datasheet.ciiva.com/29279/759428-da-01-en-chipled-0603-w-kl-rot-150060rs75000-29279196.pdf?src-supplier=Conrad, ComponentLink2URL=https://datasheet.ciiva.com/29279/759428-da-01-en-chipled-0603-w-kl-rot-150060rs75000-29279196.pdf?src-supplier=Conrad, Dominant Wavelength=625nm, Height=0.8mm, Item Type=LEDs, Length=1.6mm, Lens Size=0.7mm, Lens Style=Clear,Flat,Rectangular, Lens Transparency=Clear, Luminous Intensity=250mcd, Mounting Technology="Surface Mount", Packaging="Cut Tape", Reach SVHC Compliant=Unknown, Reverse Voltage=5V, RoHS=Yes, RoHS Compliant=Yes, Series=WL-SMCW, Stock=15900, Supplier=Rs, Viewing Angle=140°, Wavelength=625nm, Width=0.8mm
Q1: "Transistor MOSFET P-CH 20V 3.1A 3-Pin SOT-23", Continuous Drain Current (ID)=-2.3A, Drain to Source Breakdown Voltage=-20V, Drain to Source Resistance=90mR, Gate to Source Voltage (Vgs)=8V, Manufacturer=Vishay, Max Operating Temperature=150°C, Min Operating Temperature=-55°C, Power Dissipation=860mW, Supplier Part Number=742-SI2301CDS-T1-BE3CT-ND, Category=MOSFETs, Drain to Source Voltage (Vdss)=-20V, Height=1.12mm, Manufacturer Part Number=SI2301CDS-T1-BE3, Number of Channels=1NUMBER, Pricing="1=0.37, 10=0.289, 100=0.1734, 500=0.1606, 1000=0.1092 (USD)", RoHS=Yes, Stock=6842, Supplier=Digikey, Turn-Off Delay Time=30ns, Turn-On Delay Time=11ns
R1: library part RT0402BRE0712KL, "RES SMD 12K OHM 0.1% 1/16W 0402", Case Code (Imperial)=0402, Case Code (Metric)=1005, LCSC Part Number=C853013, Manufacturer=Yageo, Max Operating Temperature=155°C, Max Power Dissipation=63mW, Min Operating Temperature=-55°C, Power Rating=62.5mW, Temperature Coefficient=50ppm/°C, Tolerance=0.1%, Voltage Rating (DC)=50V, Case/Package=0402, ComponentLink1Description=http://www.yageo.com/documents/recent/PYu-RT_1-to-0.01_RoHS_L_9.pdf?src-supplier=Digikey, ComponentLink1URL=http://www.yageo.com/documents/recent/PYu-RT_1-to-0.01_RoHS_L_9.pdf?src-supplier=Digikey, Height=350um, Item Type=Resistors, Lead Free="Lead Free", Length=1mm, Manufacturer Part Number=RT0402BRE0712KL, Number of Terminations=2, Packaging="Cut Tape", Pricing="1=0.15, 10=0.096, 50=0.0836, 100=0.0714, 500=0.05508, 1000=0.04794, 5000=0.03632 (USD)", RoHS=Yes, RoHS Compliant=Yes, Series=RT, Stock=6190, Supplier=Digikey, Width=500um
R2: library part RT0402BRE0727KL, "RES SMD 27K OHM 0.1% 1/16W 0402", Case Code (Imperial)=0402, LCSC Part Number=C853174, Manufacturer=Yageo, Max Operating Temperature=155°C, Max Power Dissipation=63mW, Min Operating Temperature=-55°C, Package Quantity=10000, Supplier Part Number=YAG4364CT-ND, Temperature Coefficient=50ppm/°C, Tolerance=0.1%, Voltage Rating (DC)=50V, Case/Package=0402, Category="Chip SMD Resistors", ComponentLink1Description=https://datasheet.ciiva.com/2582/pyu-rt-1-to-0-05-rohs-l-5-2582721.pdf?src-supplier=Digikey, ComponentLink1URL=https://datasheet.ciiva.com/2582/pyu-rt-1-to-0-05-rohs-l-5-2582721.pdf?src-supplier=Digikey, Height=0.014inch, Item Type=Resistor, Lead Free="Lead Free", Length=0.039inch, Manufacturer Part Number=RT0402BRE0727KL, Number of Terminations=2, Packaging="Tape and Reel", Pricing="1=0.16, 10=0.121, 50=0.0958, 100=0.0858, 500=0.06536, 1000=0.05776, 5000=0.0428 (USD)", RoHS=Yes, RoHS Compliant=Yes, Series=RT, Stock=20118, Supplier=Digikey, Width=0.02inch
R3: library part RC0402FR-07100KL, "RES 100K OHM 1% 1/16W 0402", Case Code (Imperial)=0402, Case Code (Metric)=1005, LCSC Part Number=C60491, Manufacturer=Yageo, Max Operating Temperature=155°C, Max Power Dissipation=63mW, Min Operating Temperature=-55°C, Package Quantity=1, Resistance=100kR, Resistance Tolerance=1%, Resistor Type="Thick Film", Supplier Part Number 1=603-RC0402FR-07100KL, Temperature Coefficient=100ppm/°C, Voltage Rating=50V, Case/Package=0402, Category="Chip SMD Resistors", ComponentLink1Description=https://datasheet.ciiva.com/11819/0900766b80c66297-11819452.pdf?src-supplier=RSComponents, ComponentLink1URL=https://datasheet.ciiva.com/11819/0900766b80c66297-11819452.pdf?src-supplier=RSComponents, ComponentLink2Description=https://datasheet.ciiva.com/22747/1018594-22747509.pdf?src-supplier=Element14, ComponentLink2URL=https://datasheet.ciiva.com/22747/1018594-22747509.pdf?src-supplier=Element14, ComponentLink3Description=https://datasheet.ciiva.com/2453/pyu-r-int-thick-7-2453362.pdf?src-supplier=Digi-Key, ComponentLink3URL=https://datasheet.ciiva.com/2453/pyu-r-int-thick-7-2453362.pdf?src-supplier=Digi-Key, ComponentLink4Description=https://datasheet.ciiva.com/2453/pyu-r-int-thick-7-2453363.pdf?src-supplier=Digi-Key, ComponentLink4URL=https://datasheet.ciiva.com/2453/pyu-r-int-thick-7-2453363.pdf?src-supplier=Digi-Key, ComponentLink5Description=https://datasheet.ciiva.com/2453/pyu-r-int-thick-7-2453361.pdf?src-supplier=Digi-Key, ComponentLink5URL=https://datasheet.ciiva.com/2453/pyu-r-int-thick-7-2453361.pdf?src-supplier=Digi-Key, ComponentLink6Description=https://datasheet.ciiva.com/12667/pyu-rc0402-51-rohs-l-6-r-12667930.pdf?src-supplier=Mouser, ComponentLink6URL=https://datasheet.ciiva.com/12667/pyu-rc0402-51-rohs-l-6-r-12667930.pdf?src-supplier=Mouser, ComponentLink7Description=https://datasheet.ciiva.com/15189/getdatasheetpartid-323696-15189334.pdf?src-supplier=Verical, ComponentLink7URL=https://datasheet.ciiva.com/15189/getdatasheetpartid-323696-15189334.pdf?src-supplier=Verical, Construction=Rectangular, Depth=0.5mm, Features="Moisture Resistant", Height=0.016inch, Item Type=Resistor, Lead Free="Lead Free", Length=0.039inch, Manufacturer Part Number=RC0402FR-07100KL, Military Standard=Not, Number of Terminations=2, Packaging="Tape and Reel", Power Rating=63mW, Pricing 1="1=0.10000, 10=0.01200, 50=0.01200, 100=0.00500, 1000=0.00300, 2500=0.00200, 10000=0.00100 (USD)", REACH SVHC="No SVHC", RoHS=Yes, RoHS Compliant=Yes, Series=RC, Stock 1=7759549, Supplier 1=Mouser, Technology="THICK FILM", Termination=SMD/SMT, Tolerance=1%, Width=0.02inch, Working Voltage=50V
R4 R5 R8 R9 R19: library part RE0402DRE0710KL, "RES SMD 10K OHM 0.5% 1/16W 0402", Case/Package=0402, LCSC Part Number=C851874, Manufacturer=Yageo, Max Operating Temperature=155°C, Max Power Dissipation=63mW, Min Operating Temperature=-55°C, Supplier Part Number=8132697, Temperature Coefficient=50ppm/°C, Tolerance=0.5%, Category="Chip SMD Resistors", ComponentLink1Description=http://www.yageo.com/NewPortal/yageodocoutput?fileName=/pdf/R-Chip/PYu-RE_105_RoHS_L_6.pdf&src-supplier=Digi-Key, ComponentLink1URL=http://www.yageo.com/NewPortal/yageodocoutput?fileName=/pdf/R-Chip/PYu-RE_105_RoHS_L_6.pdf&src-supplier=Digi-Key, Features="Moisture Resistant", Height=0.015inch, Item Type=Resistor, Length=0.039inch, Manufacturer Part Number=RE0402DRE0710KL, Number of Terminations=2, Packaging="Tape and Reel", Pricing="10000=0.0059, 40000=0.0056, 150000=0.0053, 250000=0.0052, 500000=0.0049 (USD)", RoHS=Yes, RoHS Compliant=Yes, Series=RE, Stock=10000, Supplier="Future Electronics", Width=0.02inch
R6: library part RC0402FR-071K5L, "RES 1.5K OHM 1% 1/16W 0402", Case Code (Imperial)=0402, Case Code (Metric)=1005, LCSC Part Number=C114759, Manufacturer=Yageo, Max Operating Temperature=155°C, Max Power Dissipation=63mW, Min Operating Temperature=-55°C, Package Quantity=1, Power Rating=62.5mW, Resistance=1.5kR, Resistance Tolerance=1%, Resistor Type="Thick Film", Supplier Part Number 1=311-1.50KLRCT-ND, Temperature Coefficient=100ppm/°C, Voltage Rating=50V, Case/Package=0402, Category="Chip SMD Resistors", ComponentLink1Description=https://datasheet.ciiva.com/11808/0900766b80c66297-11808238.pdf?src-supplier=RSComponents, ComponentLink1URL=https://datasheet.ciiva.com/11808/0900766b80c66297-11808238.pdf?src-supplier=RSComponents, ComponentLink2Description=https://datasheet.ciiva.com/46394/1018594-46394950.pdf?src-supplier=Element14, ComponentLink2URL=https://datasheet.ciiva.com/46394/1018594-46394950.pdf?src-supplier=Element14, ComponentLink3Description=https://datasheet.ciiva.com/2453/pyu-r-int-thick-7-2453440.pdf?src-supplier=Digi-Key, ComponentLink3URL=https://datasheet.ciiva.com/2453/pyu-r-int-thick-7-2453440.pdf?src-supplier=Digi-Key, ComponentLink4Description=https://datasheet.ciiva.com/2453/pyu-r-int-thick-7-2453441.pdf?src-supplier=Digi-Key, ComponentLink4URL=https://datasheet.ciiva.com/2453/pyu-r-int-thick-7-2453441.pdf?src-supplier=Digi-Key, ComponentLink5Description=https://datasheet.ciiva.com/2453/pyu-r-int-thick-7-2453439.pdf?src-supplier=Digi-Key, ComponentLink5URL=https://datasheet.ciiva.com/2453/pyu-r-int-thick-7-2453439.pdf?src-supplier=Digi-Key, ComponentLink6Description=https://datasheet.ciiva.com/12558/pyu-rc0402-51-rohs-l-6-r-8721-12558542.pdf?src-supplier=Mouser, ComponentLink6URL=https://datasheet.ciiva.com/12558/pyu-rc0402-51-rohs-l-6-r-8721-12558542.pdf?src-supplier=Mouser, ComponentLink7Description=https://datasheet.ciiva.com/7849/1018594-7849863.pdf?src-supplier=Element14, ComponentLink7URL=https://datasheet.ciiva.com/7849/1018594-7849863.pdf?src-supplier=Element14, ComponentLink8Description=https://datasheet.ciiva.com/7849/1018594-7849864.pdf?src-supplier=Element14, ComponentLink8URL=https://datasheet.ciiva.com/7849/1018594-7849864.pdf?src-supplier=Element14, ComponentLink9Description=https://datasheet.ciiva.com/15189/getdatasheetpartid-323992-15189370.pdf?src-supplier=Verical, ComponentLink9URL=https://datasheet.ciiva.com/15189/getdatasheetpartid-323992-15189370.pdf?src-supplier=Verical, Construction=Rectangular, Depth=0.5mm, Features="Moisture Resistant", Height=0.016inch, Lead Free="Lead Free", Length=1mm, Manufacturer Part Number=RC0402FR-071K5L, Military Standard=Not, Number of Terminations=2, Packaging="Tape and Reel", Pricing 1="1=0.10000, 10=0.01500, 100=0.00610, 1000=0.00275, 2500=0.00239, 5000=0.00197 (USD)", REACH SVHC="No SVHC", RoHS=Yes, RoHS Compliant=Yes, Series=RC, Size Code=0402, Stock 1=2832947, Supplier 1=Digi-Key, Technology="THICK FILM", Termination=SMD/SMT, Tolerance=1%, Width=0.02inch
R7: library part RC0402FR-071KL, "RES 1K OHM 1% 1/16W 0402", Case Code (Imperial)=0402, Case Code (Metric)=1005, LCSC Part Number=C106235, Manufacturer=Yageo, Max Operating Temperature=155°C, Max Power Dissipation=63mW, Min Operating Temperature=-55°C, Power Rating=62.5mW, Resistance=1kR, Resistance Tolerance=1%, Resistor Type="Thick Film", Temperature Coefficient=100ppm/°C, Voltage Rating=50V, Case/Package=0402, Category="Chip SMD Resistors", ComponentLink1Description=https://datasheet.ciiva.com/11819/0900766b80c66297-11819477.pdf?src-supplier=RSComponents, ComponentLink1URL=https://datasheet.ciiva.com/11819/0900766b80c66297-11819477.pdf?src-supplier=RSComponents, ComponentLink2Description=https://datasheet.ciiva.com/7983/1018594-7983502.pdf?src-supplier=Element14, ComponentLink2URL=https://datasheet.ciiva.com/7983/1018594-7983502.pdf?src-supplier=Element14, ComponentLink3Description=https://datasheet.ciiva.com/22747/1018594-22747513.pdf?src-supplier=Element14, ComponentLink3URL=https://datasheet.ciiva.com/22747/1018594-22747513.pdf?src-supplier=Element14, ComponentLink4Description=https://datasheet.ciiva.com/12666/pyu-rc0402-51-rohs-l-6-r-12666741.pdf?src-supplier=Mouser, ComponentLink4URL=https://datasheet.ciiva.com/12666/pyu-rc0402-51-rohs-l-6-r-12666741.pdf?src-supplier=Mouser, ComponentLink5Description=https://datasheet.ciiva.com/7849/1018594-7849869.pdf?src-supplier=Element14, ComponentLink5URL=https://datasheet.ciiva.com/7849/1018594-7849869.pdf?src-supplier=Element14, ComponentLink6Description=https://datasheet.ciiva.com/7849/1018594-7849871.pdf?src-supplier=Element14, ComponentLink6URL=https://datasheet.ciiva.com/7849/1018594-7849871.pdf?src-supplier=Element14, ComponentLink7Description=https://datasheet.ciiva.com/17063/pyu-rc0402-51-rohs-l-6-r-17063193.pdf?src-supplier=Future+Electronics, ComponentLink7URL=https://datasheet.ciiva.com/17063/pyu-rc0402-51-rohs-l-6-r-17063193.pdf?src-supplier=Future+Electronics, Construction=Rectangular, Depth=0.5mm, Features="Moisture Resistant", Height=0.32mm, Item Type=Resistor, Lead Free="Lead Free", Length=1mm, Manufacturer Part Number=RC0402FR-071KL, Military Standard=Not, Number of Pins=2, Number of Terminations=2, Packaging="Tape and Reel", Pricing 1="10000=0.00085, 20000=0.00087, 40000=0.00084, 60000=0.00083, 80000=0.00079, 100000=0.00078, 1000000=0.00076 (USD)", Reach SVHC Compliant=Yes, RoHS=Yes, RoHS Compliant=Yes, Series=RC, Size Code=0402, Stock 1=13030000, Supplier 1=Avnet, Supplier Part Number 1=RC0402FR-071KL, Technology="THICK FILM", Termination=SMD/SMT, Tolerance=1%, Voltage Rating (DC)=50V, Width=0.5mm
R10: library part RT0402BRD0756KL, "RES SMD 56K OHM 0.1% 1/16W 0402", LCSC Part Number=C852845, Manufacturer=Yageo, ComponentLink1Description=https://datasheet.ciiva.com/12721/pyu-rt-1-to-0-05-rohs-l-4-12721243.pdf?src-supplier=Mouser, ComponentLink1URL=https://datasheet.ciiva.com/12721/pyu-rt-1-to-0-05-rohs-l-4-12721243.pdf?src-supplier=Mouser, ComponentLink2Description=https://datasheet.ciiva.com/2582/pyu-rt-1-to-0-05-rohs-l-4-2582430.pdf?src-supplier=Digikey, ComponentLink2URL=https://datasheet.ciiva.com/2582/pyu-rt-1-to-0-05-rohs-l-4-2582430.pdf?src-supplier=Digikey, Item Type=Resistors, Manufacturer Part Number=RT0402BRD0756KL, Pricing="10000=0.0279 (USD)", RoHS=Yes, Stock=70000, Supplier="Arrow Electronics"
R11: library part RC0402DR-07200KL, "RES 200K OHM 0.5% 1/16W 0402", Case/Package=0402, LCSC Part Number=C138077, Manufacturer=Yageo, Max Operating Temperature=155°C, Max Power Dissipation=63mW, Min Operating Temperature=-55°C, Resistance=200kR, Resistor Type="Thick Film", Supplier Part Number 1=603-RC0402DR-07200KL, Temperature Coefficient=100ppm/°C, Tolerance=0.5%, Category="Chip SMD Resistors", ComponentLink1Description=http://www.yageo.com.tw/exep/pages/download/literatures/PYu-R_INT-thick_7.pdf?src-supplier=Digi-Key, ComponentLink1URL=http://www.yageo.com.tw/exep/pages/download/literatures/PYu-R_INT-thick_7.pdf?src-supplier=Digi-Key, Features="Moisture Resistant", Height=0.016inch, Length=0.039inch, Manufacturer Part Number=RC0402DR-07200KL, Number of Terminations=2, Packaging="Tape and Reel", Pricing 1="1=0.13000, 10=0.07000, 50=0.07000, 100=0.02900, 1000=0.01300, 10000=0.00700 (USD)", RoHS=Yes, Supplier 1=Mouser, Width=0.02inch
R12: library part RT0402BRD07249RL, "RES SMD 249 OHM 0.1% 1/16W 0402", LCSC Part Number=C852662, Manufacturer=Yageo, Category="Chip SMD Resistors", ComponentLink1Description=https://datasheet.ciiva.com/2582/pyu-rt-1-to-0-05-rohs-l-5-2582249.pdf?src-supplier=Digi-Key, ComponentLink1URL=https://datasheet.ciiva.com/2582/pyu-rt-1-to-0-05-rohs-l-5-2582249.pdf?src-supplier=Digi-Key, Item Type=Resistor, Manufacturer Part Number=RT0402BRD07249RL, Pricing="1=0.2065, 10=0.1009, 25=0.1005, 100=0.0454, 250=0.045, 500=0.043, 1000=0.026, 3000=0.0241, 6000=0.0223 (USD)", RoHS=Yes, Stock=6437, Supplier="Arrow Electronics", Supplier Part Number=RT0402BRD07249RL
R13 R14: library part RC0402FR-0747RL, "RES 47 OHM 1% 1/16W 0402", Case Code (Imperial)=0402, Case Code (Metric)=1005, LCSC Part Number=C137973, Manufacturer=Yageo, Max Operating Temperature=155°C, Max Power Dissipation=63mW, Min Operating Temperature=-55°C, Package Quantity=1, Resistance Tolerance=1%, Resistor Type="Thick Film", Temperature Coefficient=100ppm/°C, Voltage Rating=50V, Case/Package=0402, Category="Chip SMD Resistors", ComponentLink1Description=LCSC, ComponentLink1URL=https://www.lcsc.com/product-detail/Chip-span-style-background-color-ff0-Resistor-span-Surface-Mount_YAGEO-RC0402FR-0747RL_C137973.html, Construction=Rectangular, Depth=0.5mm, Features="Moisture Resistant", Height=0.016inch, Item Type=Resistor, Lead Free="Lead Free", Length=1mm, Manufacturer Part Number=RC0402FR-0747RL, Military Standard=Not, Number of Terminations=2, Packaging="Tape and Reel", Power Rating=63mW, Pricing 1="10000=0.00085 (USD)", Resistance=47R, RoHS=Yes, RoHS Compliant=Yes, Series=RC, Size Code=0402, Stock 1=390000, Supplier 1=Avnet, Supplier Part Number 1=RC0402FR-0747RL, Technology="THICK FILM", Termination=SMD/SMT, Tolerance=1%, Weight=2.3E-05oz, Width=0.02inch
R15 R16: library part RCS04020000Z0ED, "RES SMD 0 OHM JUMPER 1/5W 0402", Case Code (Imperial)=0402, Case Code (Metric)=1005, LCSC Part Number=C844673, Manufacturer="Vishay Dale", Max Operating Temperature=155°C, Max Power Dissipation=200mW, Min Operating Temperature=-55°C, Resistance=0mR, Resistor Type="Thick Film", Supplier Part Number 1=541-2877-1-ND, Case/Package=0402, ComponentLink1Description=http://www.farnell.com/datasheets/2618474.pdf?src-supplier=Farnell, ComponentLink1URL=http://www.farnell.com/datasheets/2618474.pdf?src-supplier=Farnell, ComponentLink2Description=http://www.farnell.com/datasheets/2618474.pdf?src-supplier=Element14, ComponentLink2URL=http://www.farnell.com/datasheets/2618474.pdf?src-supplier=Element14, ComponentLink3Description=http://www.vishay.com/docs/20065/rcse3.pdf?src-supplier=Digi-Key, ComponentLink3URL=http://www.vishay.com/docs/20065/rcse3.pdf?src-supplier=Digi-Key, ComponentLink4Description=http://www.farnell.com/datasheets/2618474.pdf?src-supplier=Newark, ComponentLink4URL=http://www.farnell.com/datasheets/2618474.pdf?src-supplier=Newark, Features="Automotive AEC-Q200", Height=0.016inch, Item Type=Resistor, Length=0.039inch, Manufacturer Part Number=RCS04020000Z0ED, Number of Terminations=2, Packaging="Tape and Reel", Pricing 1="1=0.1, 10=0.083, 25=0.0576, 50=0.0448, 100=0.032, 250=0.02496, 500=0.01984, 1000=0.01408, 5000=0.01088 (USD)", RoHS Compliant=Yes, Stock 1=35470, Supplier 1=Digi-Key, Width=0.02inch
R17 R18: library part RC0402FR-075K1L, "RES 5.1K OHM 1% 1/16W 0402", Case Code (Imperial)=0402, Case Code (Metric)=1005, LCSC Part Number=C105872, Manufacturer=Yageo, Max Operating Temperature=155°C, Max Power Dissipation=63mW, Min Operating Temperature=-55°C, Package Quantity=1, Resistance=5.1kR, Resistance Tolerance=1%, Resistor Type="Thick Film", Temperature Coefficient=100ppm/°C, Voltage Rating=50V, Case/Package=0402, Category="Chip SMD Resistors", ComponentLink1Description=https://datasheet.ciiva.com/7983/1018594-7983519.pdf?src-supplier=Element14, ComponentLink1URL=https://datasheet.ciiva.com/7983/1018594-7983519.pdf?src-supplier=Element14, ComponentLink2Description=https://datasheet.ciiva.com/46394/1018594-46394936.pdf?src-supplier=Element14, ComponentLink2URL=https://datasheet.ciiva.com/46394/1018594-46394936.pdf?src-supplier=Element14, ComponentLink3Description=https://datasheet.ciiva.com/2453/pyu-r-int-thick-7-2453401.pdf?src-supplier=Digi-Key, ComponentLink3URL=https://datasheet.ciiva.com/2453/pyu-r-int-thick-7-2453401.pdf?src-supplier=Digi-Key, ComponentLink4Description=https://datasheet.ciiva.com/2453/pyu-r-int-thick-7-2453402.pdf?src-supplier=Digi-Key, ComponentLink4URL=https://datasheet.ciiva.com/2453/pyu-r-int-thick-7-2453402.pdf?src-supplier=Digi-Key, ComponentLink5Description=https://datasheet.ciiva.com/2453/pyu-r-int-thick-7-2453400.pdf?src-supplier=Digi-Key, ComponentLink5URL=https://datasheet.ciiva.com/2453/pyu-r-int-thick-7-2453400.pdf?src-supplier=Digi-Key, ComponentLink6Description=https://datasheet.ciiva.com/12558/pyu-rc0402-51-rohs-l-6-r-8721-12558460.pdf?src-supplier=Mouser, ComponentLink6URL=https://datasheet.ciiva.com/12558/pyu-rc0402-51-rohs-l-6-r-8721-12558460.pdf?src-supplier=Mouser, ComponentLink7Description=https://datasheet.ciiva.com/16744/pyu-rc0402-51-rohs-l-6-r-16744283.pdf?src-supplier=Future+Electronics, ComponentLink7URL=https://datasheet.ciiva.com/16744/pyu-rc0402-51-rohs-l-6-r-16744283.pdf?src-supplier=Future+Electronics, ComponentLink8Description=https://datasheet.ciiva.com/15189/getdatasheetpartid-323636-15189493.pdf?src-supplier=Verical, ComponentLink8URL=https://datasheet.ciiva.com/15189/getdatasheetpartid-323636-15189493.pdf?src-supplier=Verical, Construction=Rectangular, Depth=0.5mm, Features="Moisture Resistant", Height=0.016inch, Item Type=Resistor, Lead Free="Lead Free", Length=1mm, Manufacturer Part Number=RC0402FR-075K1L, Military Standard=Not, Number of Terminations=2, Packaging="Tape and Reel", Power Rating=63mW, Pricing 1="10000=0.00085 (USD)", RoHS=Yes, RoHS Compliant=Yes, Series=RC, Stock 1=65000, Supplier 1=Avnet, Supplier Part Number 1=RC0402FR-075K1L, Technology="THICK FILM", Termination=SMD/SMT, Tolerance=1%, Voltage Rating (DC)=50V, Width=0.02inch, Working Voltage=50V